# Altium PCB SOM_PCB_BLUETECHNIX.PcbDoc (part 5 of 8)
Units mil, origin at the board's own origin, x right, y up, seen from the top; angles counter-clockwise.
Board outline 1225 x 1620 mil, 8 copper layers (Top Layer, Int1 (Sign), Int2 (GND), Int3 (Sign), Int4 (Sign), Int5 (PWR), Int6 (Sign), Bottom Layer), stack 66.2 mil thick; 65 components, 201 nets, 938 pads, 497 vias.
Unrouted connection lines stored in the file: 25.
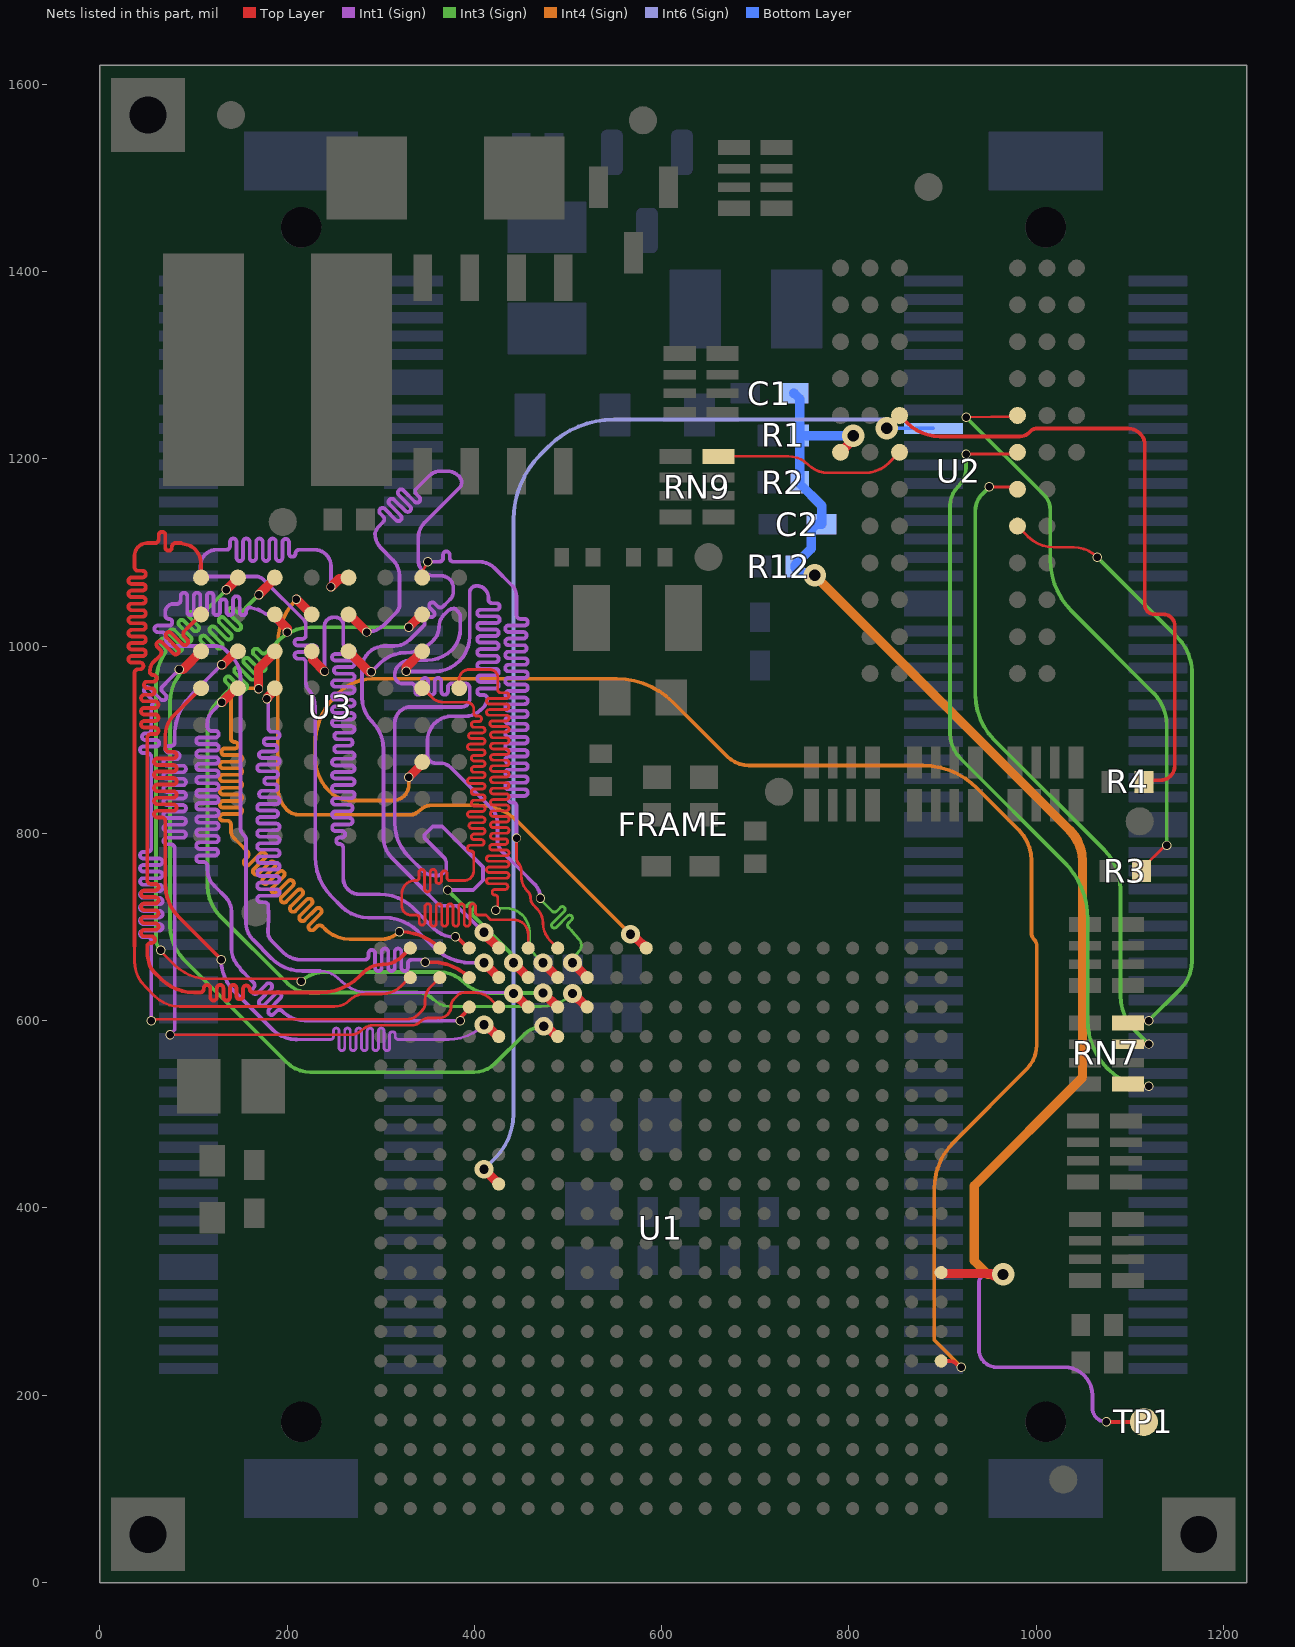
[diagram p10: the nets of this part, all layers, seen from the top]

## Via types
v1: diameter 20, hole 10, Top Layer to Int2 (GND), tented both sides, 68 vias
v2: diameter 10, hole 8, Top Layer to Int3 (Sign), tented both sides, 53 vias
v3: diameter 20, hole 10, Top Layer to Bottom Layer, tented both sides, 44 vias
v4: diameter 10, hole 8, Top Layer to Int1 (Sign), tented both sides, 41 vias
v5: diameter 20, hole 10, Top Layer to Int5 (PWR), tented both sides, 40 vias
v6: diameter 10, hole 8, Top Layer to Int4 (Sign), tented both sides, 33 vias
v7: diameter 20, hole 10, Top Layer to Int3 (Sign), tented both sides, 25 vias
v8: diameter 24, hole 12, Int6 (Sign) to Bottom Layer, tented both sides, 22 vias
v9: diameter 20, hole 10, Top Layer to Int4 (Sign), tented both sides, 19 vias
v10: diameter 24, hole 12, Int4 (Sign) to Bottom Layer, tented both sides, 17 vias
v11: diameter 24, hole 12, Int2 (GND) to Bottom Layer, tented both sides, 15 vias
v12: diameter 20, hole 10, Top Layer to Int1 (Sign), tented both sides, 13 vias
v13: diameter 24, hole 12, Top Layer to Int6 (Sign), tented both sides, 11 vias
v14: diameter 24, hole 12, Top Layer to Int4 (Sign), tented both sides, 10 vias
v15: diameter 24, hole 12, Top Layer to Int3 (Sign), tented both sides, 8 vias
v16: diameter 11, hole 8, Top Layer to Int1 (Sign), tented both sides, 8 vias
v17: diameter 10, hole 8, Top Layer to Bottom Layer, tented both sides, 7 vias
v18: diameter 20, hole 10, Top Layer to Int6 (Sign), tented both sides, 7 vias
v19: diameter 10, hole 8, Top Layer to Int6 (Sign), tented both sides, 6 vias
v20: diameter 10, hole 8, Int4 (Sign) to Bottom Layer, tented both sides, 6 vias
v21: diameter 24, hole 12, Int1 (Sign) to Bottom Layer, tented both sides, 5 vias
v22: diameter 24, hole 12, Top Layer to Int2 (GND), tented both sides, 5 vias
v23: diameter 10, hole 7, Top Layer to Int1 (Sign), tented both sides, 4 vias
v24: diameter 10, hole 8, Top Layer to Int2 (GND), tented both sides, 4 vias
v25: diameter 10, hole 8, Int2 (GND) to Bottom Layer, tented both sides, 4 vias
v26: diameter 24, hole 12, Int3 (Sign) to Bottom Layer, tented both sides, 4 vias
v27: diameter 24, hole 12, Top Layer to Bottom Layer, tented both sides, 4 vias
v28: diameter 10, hole 8, Int5 (PWR) to Bottom Layer, tented both sides, 3 vias
v29: diameter 20, hole 10, Int2 (GND) to Bottom Layer, tented both sides, 2 vias
v30: diameter 10, hole 8, Int6 (Sign) to Bottom Layer, tented both sides, 2 vias
v31: diameter 10, hole 8, Top Layer to Bottom Layer, 1 vias
v32: diameter 22, hole 12, Int2 (GND) to Bottom Layer, tented both sides, 1 vias
v33: diameter 24, hole 10, Int2 (GND) to Bottom Layer, tented both sides, 1 vias
v34: diameter 20, hole 12, Top Layer to Int5 (PWR), tented both sides, 1 vias
v35: diameter 20, hole 12, Top Layer to Int2 (GND), tented both sides, 1 vias
v36: diameter 24, hole 12, Top Layer to Int5 (PWR), tented both sides, 1 vias
v37: diameter 24, hole 12, Top Layer to Int1 (Sign), tented both sides, 1 vias

## Nets (pads, with @x,y where several pads share a name; then routed paths per layer and width w, separated by ;. In a path a pad name is that pad's centre, name@x,y a point inside that pad or via, vN(x,y) a via of type N, cw(c..) or ccw(c..) an arc to the next point about the centre after c; other vN are vias at no path point) (continued)
DDR_RES_D\R\A\S\: RN7.8 U2.H7 | length 670.8
  Top Layer w3: U2.H7@980,1128.15 991.32,1116.82 ccw(c1018.67,1144.17) 1018.67,1105.5 1040,1105.5 cw(c1040,1070.49) 1064.75,1095.25 v2(1065,1095) ; RN7.8@1097.83,597.48 1100.35,600 v2(1120,600)
  Int3 (Sign) w4: v2(1065,1095) 1150.97,1009.03 cw(c1113.98,972.03) 1165.95,978.07 cw(c1113.98,972.03) 1166.3,972.03 1166.3,667.71 1166.3,663.83 cw(c1123.96,663.83) 1153.91,633.91 v2(1120,600)
DDR_RES_D\W\R\: RN7.7 U2.G7 | length 722.3
  Top Layer w3: v2(950,1170) 977.52,1170 U2.G7@980,1167.52 ; RN7.7@1097.83,574.84 1097.99,575 v2(1120,575)
  Int3 (Sign) w4: v2(950,1170) 942.5,1162.5 ccw(c960.61,1144.39) 935.62,1150 ccw(c960.61,1144.39) 935,1144.39 935,948.28 ccw(c1003.28,948.28) 954.98,900.02 1072.32,782.68 ; 1072.34,782.66 cw(c1029.64,740) 1090,740 1090,626.21 ccw(c1141.21,626.21) 1104.99,590.01 v2(1120,575)
DDR_RES_DQM0: RN7.5 U2.F7 | length 849.9
  Top Layer w3: v2(925,1205) 978.11,1205 U2.F7@980,1206.89 ; RN7.5@1097.83,532.52 1100.35,530 v2(1120,530)
  Int3 (Sign) w4: 916.49,1170.25 ccw(c937.02,1149.74) 908,1149.74 908,907.22 ccw(c947.04,907.22) 919.41,879.64 ; 916.51,1170.28 ccw(c895.98,1190.78) 925,1190.78 v2(925,1205) ; 919.43,879.62 1030.07,768.98 ; 1030.1,768.95 cw(c969.87,708.79) 1040,757.05 cw(c969.87,708.79) 1055,708.79 1055,600 ccw(c1127.43,600) 1057.82,580 ccw(c1127.43,600) 1076.21,548.79 1077.32,547.68 ccw(c1120,590.36) v2(1120,530)
DDR_RES_DQM1: RN9.8 U2.F3 | length 205.5
  Top Layer w3: RN9.8@660.67,1202.64 735.11,1202.64 cw(c735.11,1172.53) 756.39,1193.83 ; 756.41,1193.81 ccw(c777.69,1215.11) 777.69,1185 816.65,1185 ccw(c816.65,1222.37) 843.05,1195.92 ; 843.07,1195.94 U2.F3@854.02,1206.89
DDR_RES_DQS0: R3.2 U2.E7 | length 634.2
  Top Layer w3: v2(925.1,1244.31) U2.E7@977.46,1245 ; U2.E7@977.51,1245 ccw(c977.5,1248) 979.62,1245.88 U2.E7@980,1246.26 ; R3.2@1112.52,760 1112.52,761.77 1137.81,787.07 v2(1139.5,787.07)
  Int3 (Sign) w4: v2(925.1,1244.31) 1007.88,1162.12 ; 1007.93,1162.07 cw(c990.86,1145) 1015,1145 1015,1092.68 ccw(c1093.91,1092.68) 1038.11,1036.89 1125,950 cw(c1090.01,915) 1139.5,915 v2(1139.5,787.07) ; 1007.92,1162.08 ccw(c1005.08,1159.27) 1007.88,1162.12
DDR_RES_DQS1: R4.2 U2.E3 | length 689.2
  Top Layer w4: U2.E3@854.02,1246.26 861.67,1238.6 ccw(c897.1,1274.02) 897.1,1223.93 982.51,1223.93 ccw(c982.51,1238.15) 992.57,1228.09 994.65,1230.18 cw(c999.68,1225.15) 999.68,1232.26 1098.33,1232.26 cw(c1098.33,1214.58) 1116.01,1214.58 1116.01,1043.99 ccw(c1126.01,1043.99) 1126.01,1033.99 1135.63,1033.99 cw(c1135.63,1021.67) 1147.95,1021.67 1147.95,872.18 cw(c1132.48,872.18) 1132.48,856.7 1116.7,856.7 ccw(c1116.7,855) R4.2@1115,855
DDR_VREF: C1.1 C2.2 R1.1 R2.2 R12.2 TP1.0 U1.M20 U2.F1 | length 1647.4
  Top Layer w3: U1.M20@898.46,331.02 U1.M20@899.49,330
  Top Layer w4: v4(1075,171.5) TP1.0@1114.96,171.5
  Top Layer w10: U2.F1@791.02,1206.89 801.4,1217.27 v14(804.52,1224.52) ; U1.M20@899.49,330 899.75,330.26 902.06,330.26 902.32,330 952.14,330 954.46,327.68 959.58,327.68 v14(964.55,329)
  Int1 (Sign) w4: v14(964.55,329) 947.75,329 ccw(c947.75,320) 938.75,320 938.75,248.97 ccw(c957.72,248.97) 957.72,230 1030,230 cw(c1030,200) 1060,200 1060,186.5 ccw(c1075,186.5) v4(1075,171.5)
  Int4 (Sign) w10: v10(763.35,1075.75) 1035.84,803.27 cw(c1003.08,770.52) 1049.4,770.52 1049.4,539.4 933.75,423.75 933.75,343.52 948.07,329.21 962.09,329.21 962.3,329 v14(964.55,329)
  Bottom Layer w10: C1.1@740.76,1270 741.68,1270 747.52,1264.16 R1.1@747.52,1225 ; v10(763.35,1075.75) 760.68,1078.43 747.56,1078.43 742.52,1083.47 742.52,1086.77 759.84,1104.09 759.84,1124.16 765.68,1130 C2.2@770.76,1130 770.76,1149.98 747.52,1173.23 R2.2@747.52,1175 R1.1@747.52,1225 ; v14(804.52,1224.52) 804.28,1224.76 747.76,1224.76 R1.1@747.52,1225
  other v10: 804.52,1224.52
DR0PRI: FRAME.94 U1.J5 | length 1239.1
  Top Layer w10: v18(410.28,441.26) U1.J5@426.02,425.51
  Int6 (Sign) w4: v18(410.28,441.26) 422,452.99 ; 422.03,453.01 ccw(c374.28,500.71) 441.77,500.71 441.77,1134.4 cw(c541.77,1134.4) 471.06,1205.11 478.66,1212.71 cw(c549.37,1142) 549.37,1242 v8@840.28,1242 ; v8(840.28,1232.52) v8@843.78,1236.02
  Bottom Layer w4: v8(840.28,1232.52) FRAME.94@890.12,1232.52
F\L\A\S\H\_\A\S\M\0\: U1.A10 U3.B4 | length 703.9
  Top Layer w10: v6(210,1050) U3.B4@226.26,1033.74 ; v9(566.78,692.32) 571.34,689.65 U1.A10@583.5,677.48
  Int4 (Sign) w4: v6(210,1050) ccw(c258.28,1001.72) 190,1001.72 190,849.14 ccw(c224.14,849.14) 200,825 ccw(c212.07,837.07) 212.07,820 333.53,820 ccw(c333.53,825.91) 337.71,821.73 ccw(c330.21,837.07) 342.29,825 cw(c354.36,812.93) 354.36,830 404,830 cw(c404,769.56) 446.73,812.31 v9(566.78,692.32)
F\L\A\S\H\_\W\A\I\T\: U1.R20 U3.F7 | length 1687.6
  Top Layer w4: U3.F7@344.37,874.37 U3.F7@344.37,876.26 ; U1.R20@898.46,236.54 907.54,236.54 cw(c907.54,226.15) 914.88,233.49 918.38,230 v6(920,230)
  Top Layer w10: v6(330,860) U3.F7@344.37,874.37
  Int4 (Sign) w4: v6(330,860) 330,852.07 cw(c312.93,852.07) 325,840 cw(c312.93,852.07) 312.93,835 269.14,835 cw(c269.14,869.14) 261.47,835.87 cw(c269.14,869.14) 245,845 cw(c281.21,881.21) 230,881.21 230,895 cw(c302.43,895) 251.21,946.21 255.01,950.01 cw(c291.21,913.79) 291.21,965 551.85,965 cw(c551.85,879.64) 612.2,940 670,882.2 ccw(c693.38,905.58) 693.38,872.52 878.79,872.52 cw(c878.79,791.19) 924.38,858.54 cw(c878.79,791.19) 936.3,848.7 981.38,803.62 cw(c948.62,770.86) 994.95,770.86 994.95,693.52 ccw(c1004.55,693.52) 997.76,686.73 ; v6(920,230) 891.1,258.9 891.1,419.95 cw(c962.6,419.95) 912.01,470.46 cw(c962.6,419.95) 912.04,470.5 989.63,548.08 ccw(c963.2,574.51) 1000.57,574.51 1000.57,679.95 ccw(c990.98,679.95) 997.77,686.72
FLASH_A1: U1.B2 U3.A1 | length 1129.5
  Top Layer w3: 37.09,679.5 37.09,663.7 ccw(c75.22,663.7) 48.26,636.74 59.13,625.87 ccw(c85.37,652.11) 85.37,615 250.45,615 ccw(c250.45,638.05) 266.73,621.73 cw(c283.05,605.45) 283.05,628.5 301.14,628.5 ccw(c301.14,658.35) 322.24,637.24 330.98,645.98 U1.B2@331.54,645.98
  Top Layer w4: 37.09,679.5 37.09,962.33 37.09,966.14 37.09,971.33 cw(c41.09,971.33) 41.09,975.33 43.05,975.33 ccw(c43.05,978.83) 43.05,982.33 34.09,982.33 cw(c34.09,985.83) 34.09,989.33 45.59,989.33 ccw(c45.59,992.83) 45.59,996.33 34.09,996.33 cw(c34.09,999.83) 34.09,1003.33 45.59,1003.33 ccw(c45.59,1006.83) 45.59,1010.33 34.09,1010.33 cw(c34.09,1013.83) 34.09,1017.33 45.59,1017.33 ccw(c45.59,1020.83) 45.59,1024.33 34.09,1024.33 cw(c34.09,1027.83) 34.09,1031.33 45.59,1031.33 ccw(c45.59,1034.83) 45.59,1038.33 34.09,1038.33 cw(c34.09,1041.83) 34.09,1045.33 45.59,1045.33 ccw(c45.59,1048.83) 45.59,1052.33 34.09,1052.33 cw(c34.09,1055.83) 34.09,1059.33 45.59,1059.33 ccw(c45.59,1062.83) 45.59,1066.33 34.09,1066.33 cw(c34.09,1069.83) 34.09,1073.33 45.59,1073.33 ccw(c45.59,1076.83) 45.59,1080.33 41.09,1080.33 cw(c41.09,1084.33) 37.09,1084.33 37.09,1094.8 37.09,1096.8 ; 37.09,1096.5 cw(c50.59,1096.5) 37.09,1096.8 ; U3.A1@108.15,1073.11 108.15,1087.55 ccw(c85.7,1087.55) 101.57,1103.43 ccw(c85.7,1087.55) 98.98,1105.65 ccw(c85.7,1087.55) 96.98,1106.96 86.59,1109.98 85.7,1110 80.95,1110 ccw(c80.95,1106) 76.95,1106 76.95,1105.34 cw(c73.45,1105.34) 69.95,1105.34 69.95,1118.5 ccw(c66.45,1118.5) 62.95,1118.5 62.95,1114 cw(c58.95,1114) 58.95,1110 56.95,1110 50.59,1110 ccw(c50.59,1096.5) 41.05,1106.05 ccw(c50.59,1096.5) 37.09,1096.8
FLASH_A2: U1.A2 U3.B1 | length 1124.8
  Top Layer w4: U3.B1@108.15,1033.74 94.7,1020.3 90.18,1015.77 ccw(c93,1012.94) 90.18,1010.11 93.36,1006.93 cw(c90.88,1004.45) 93.36,1001.98 cw(c90.88,1004.45) 88.41,1001.98 76.39,1014 ccw(c73.91,1011.52) 71.44,1014 ccw(c73.91,1011.52) 71.44,1009.05 83.46,997.03 cw(c80.98,994.55) 83.46,992.08 cw(c80.98,994.55) 78.51,992.08 66.49,1004.1 ccw(c64.01,1001.62) 61.54,1004.1 ccw(c64.01,1001.62) 61.54,999.15 64.72,995.97 cw(c61.89,993.14) 64.72,990.31 56.95,982.54 ccw(c64.95,974.53) 53.63,974.53 ccw(c57.33,973) 57.33,969 cw(c57.33,965.5) 57.33,962 50.59,962 ccw(c50.59,958.5) 50.59,955 55.09,955 cw(c55.09,951.5) 55.09,948 47.59,948 ccw(c47.59,944.5) 47.59,941 59.09,941 cw(c59.09,937.5) 59.09,934 47.59,934 ccw(c47.59,930.5) 47.59,927 59.09,927 cw(c59.09,923.5) 59.09,920 47.59,920 ccw(c47.59,916.5) 47.59,913 59.09,913 cw(c59.09,909.5) 59.09,906 54.59,906 ccw(c54.59,902) 50.59,902 50.59,893 50.59,760 50.59,750.03 ccw(c54.59,750.03) 54.59,746.03 59.09,746.03 cw(c59.09,742.53) 59.09,739.03 47.59,739.03 ccw(c47.59,735.53) 47.59,732.03 59.09,732.03 cw(c59.09,728.53) 59.09,725.03 47.59,725.03 ccw(c47.59,721.53) 47.59,718.03 59.09,718.03 cw(c59.09,714.53) 59.09,711.03 47.59,711.03 ccw(c47.59,707.53) 47.59,704.03 59.09,704.03 cw(c59.09,700.53) 59.09,697.03 47.59,697.03 ccw(c47.59,693.53) 47.59,690.03 55.38,690.03 cw(c55.38,686.53) 55.38,683.03 54.59,683.03 ccw(c54.59,679.03) 50.59,679.03 50.59,669.79 53.52,658.03 ccw(c75.64,669.79) 54.71,656.03 ccw(c75.64,669.79) 57.85,652.15 ccw(c75.64,669.79) 57.93,652.07 65.3,644.7 ccw(c100.8,680.2) 100.8,630 105,630 107,630 ccw(c107,634) 111,634 111,634.69 cw(c114.5,634.69) 118,634.69 118,625 ccw(c121.5,625) 125,625 125,634.69 cw(c128.5,634.69) 132,634.69 132,625 ccw(c135.5,625) 139,625 139,634.69 cw(c142.5,634.69) 146,634.69 146,626.32 ccw(c149.5,626.32) 153,626.32 153,634 cw(c156.5,634) 160,634 ccw(c164,634) 164,630 176.62,630 235,630 ccw(c235,690.36) 277.68,647.68 281.5,651.5 cw(c302.03,630.96) 302.03,660 ccw(c302.03,689.04) 322.54,668.48 U1.A2@331.54,677.48
FLASH_A3: U1.B3 U3.C1 | length 1112.7
  Top Layer w3: v4(55,600) 56.34,601.34 60.1,601.34 60.26,601.5 327.98,601.5 ccw(c327.98,618) 339.63,606.32 ; 339.64,606.33 344.47,611.16 ccw(c337.46,618.18) 347.38,618.18 347.38,622.28 cw(c366.81,622.28) 353.06,636.01 U1.B3@363.03,645.98
  Top Layer w10: v4(85,975) 88.78,975 U3.C1@108.15,994.37
  Int1 (Sign) w4: v4(55,600) 55,683.18 55,685.18 ccw(c51,685.18) 51,689.18 46.5,689.18 cw(c46.5,692.68) 46.5,696.18 63.5,696.18 ccw(c63.5,699.68) 63.5,703.18 46.5,703.18 cw(c46.5,706.68) 46.5,710.18 63.5,710.18 ccw(c63.5,713.68) 63.5,717.18 46.5,717.18 cw(c46.5,720.68) 46.5,724.18 63.5,724.18 ccw(c63.5,727.68) 63.5,731.18 46.5,731.18 cw(c46.5,734.68) 46.5,738.18 63.5,738.18 ccw(c63.5,741.68) 63.5,745.18 46.5,745.18 cw(c46.5,748.68) 46.5,752.18 63.5,752.18 ccw(c63.5,755.68) 63.5,759.18 46.5,759.18 cw(c46.5,762.68) 46.5,766.18 63.5,766.18 ccw(c63.5,769.68) 63.5,773.18 46.5,773.18 cw(c46.5,776.68) 46.5,780.18 51,780.18 ccw(c51,784.18) 55,784.18 55,797.42 55,879.72 55,881.72 ccw(c51,881.72) 51,885.72 46.5,885.72 cw(c46.5,889.22) 46.5,892.72 59.96,892.72 ccw(c59.96,896.22) 59.96,899.72 48.63,899.72 cw(c48.63,903.22) 48.63,906.72 51,906.72 ccw(c51,910.72) 55,910.72 55,920 55,930 cw(c91.21,930) 55.3,934.65 cw(c91.21,930) 55.7,937.08 56.27,938.15 ccw(c52.74,940.03) 55.57,942.86 48.21,950.23 cw(c50.68,952.7) 48.21,955.18 cw(c50.68,952.7) 53.16,955.18 65.18,943.16 ccw(c67.65,945.63) 70.13,943.16 ccw(c67.65,945.63) 70.13,948.1 66.94,951.29 cw(c69.77,954.12) 66.94,956.94 75.3,965.3 v4(85,975)
FLASH_A4: U1.D5 U3.D1 | length 1108.3
  Top Layer w4: 78.37,925.22 ccw(c98.61,905) 70,905 70,899.02 70,891.06 ccw(c74,891.06) 74,887.06 78.5,887.06 cw(c78.5,883.56) 78.5,880.06 61.5,880.06 ccw(c61.5,876.56) 61.5,873.06 78.5,873.06 cw(c78.5,869.56) 78.5,866.06 61.5,866.06 ccw(c61.5,862.56) 61.5,859.06 78.5,859.06 cw(c78.5,855.56) 78.5,852.06 61.5,852.06 ccw(c61.5,848.56) 61.5,845.06 78.5,845.06 cw(c78.5,841.56) 78.5,838.06 61.5,838.06 ccw(c61.5,834.56) 61.5,831.06 78.5,831.06 cw(c78.5,827.56) 78.5,824.06 61.5,824.06 ccw(c61.5,820.56) 61.5,817.06 66,817.06 cw(c66,813.06) 70,813.06 70,811.06 70,745 ccw(c118.28,745) 84.12,710.88 ; 78.38,925.23 U3.D1@108.15,955 ; 84.14,710.86 129.51,665.49 v4(129.51,664.97)
  Top Layer w10: v12(410.28,595.5) 412.43,595.5 424.94,582.99 U1.D5@426.02,582.99
  Int1 (Sign) w3: 210,580 245,580 246.5,580 ccw(c246.5,583) 249.5,583 249.5,589 cw(c252.5,589) 255.5,589 255.5,571 ccw(c258.5,571) 261.5,571 261.5,589 cw(c264.5,589) 267.5,589 267.5,571 ccw(c270.5,571) 273.5,571 273.5,589 cw(c276.5,589) 279.5,589 279.5,571 ccw(c282.5,571) 285.5,571 285.5,589 cw(c288.5,589) 291.5,589 291.5,571 ccw(c294.5,571) 297.5,571 297.5,589 cw(c300.5,589) 303.5,589 303.5,571 ccw(c306.5,571) 309.5,571 309.5,585.25 cw(c312.5,585.25) 315.5,585.25 315.5,583 ccw(c318.5,583) 318.5,580 330.49,580 372.86,580 ccw(c372.86,632.92) 378.77,580.33 ccw(c372.86,632.92) v12(410.28,595.5)
  Int1 (Sign) w4: v4(129.51,664.97) ccw(c176.56,664.97) 130,658.23 ccw(c176.56,664.97) 143.28,631.72 185,590 ccw(c209.14,614.14) 209.14,580 210,580
FLASH_A5: U1.C4 U3.D2 | length 1111.4
  Top Layer w4: v4@386.15,604.48 394.53,612.86 U1.C4@394.53,614.49
  Top Layer w10: v4(130,940) 130.63,940 145.63,955 U3.D2@147.52,955
  Int1 (Sign) w4: 115,921.06 115,920.88 115,917.03 ; v4(130,940) 120.63,930.63 ccw(c134.24,917.03) 115,917.03 ; 150.86,654.14 152.92,652.09 ; 155,650 155.9,649.1 164.27,640.73 cw(c161.44,637.9) 164.27,635.07 163.62,634.41 ccw(c166.09,631.94) 163.62,629.46 ccw(c166.09,631.94) 168.57,629.46 178.06,638.96 cw(c180.54,636.49) 183.01,638.96 cw(c180.54,636.49) 183.01,634.01 170.99,621.99 ccw(c173.47,619.51) 170.99,617.04 ccw(c173.47,619.51) 175.94,617.04 187.96,629.06 cw(c190.44,626.59) 192.91,629.06 cw(c190.44,626.59) 192.91,624.11 180.89,612.09 ccw(c183.37,609.62) 180.89,607.14 ccw(c183.37,609.61) 185.84,607.14 189.02,610.32 cw(c191.85,607.49) 194.68,610.32 195,610 ; 154.98,650.03 154.48,650.52 152.92,652.09 ; 195.03,609.98 ccw(c219.14,634.14) 196.12,608.93 ccw(c219.14,634.14) 219.14,600 v4(385,600) ; 115,917.03 115,913.39 ccw(c119,913.39) 119,909.39 123.5,909.39 cw(c123.5,905.89) 123.5,902.39 106.5,902.39 ccw(c106.5,898.89) 106.5,895.39 123.5,895.39 cw(c123.5,891.89) 123.5,888.39 106.5,888.39 ccw(c106.5,884.89) 106.5,881.39 123.5,881.39 cw(c123.5,877.89) 123.5,874.39 106.5,874.39 ccw(c106.5,870.89) 106.5,867.39 123.5,867.39 cw(c123.5,863.89) 123.5,860.39 106.5,860.39 ccw(c106.5,856.89) 106.5,853.39 123.5,853.39 cw(c123.5,849.89) 123.5,846.39 106.5,846.39 ccw(c106.5,842.89) 106.5,839.39 123.5,839.39 cw(c123.5,835.89) 123.5,832.39 106.5,832.39 ccw(c106.5,828.89) 106.5,825.39 123.5,825.39 cw(c123.5,821.89) 123.5,818.39 106.5,818.39 ccw(c106.5,814.89) 106.5,811.39 123.5,811.39 cw(c123.5,807.89) 123.5,804.39 106.5,804.39 ccw(c106.5,800.89) 106.5,797.39 123.5,797.39 cw(c123.5,793.89) 123.5,790.39 106.5,790.39 ccw(c106.5,786.89) 106.5,783.39 122.84,783.39 cw(c122.84,779.89) 122.84,776.39 106.5,776.39 ccw(c106.5,772.89) 106.5,769.39 111,769.39 cw(c111,765.39) 115,765.39 115,765 115,760.89 ccw(c138.08,760.89) 121.76,744.57 ccw(c139.41,759.18) 123.21,742.98 134.1,732.08 cw(c118.3,716.28) 140.65,716.28 140.65,677.27 ccw(c169.42,677.27) 149.07,656.92 ccw(c172.03,671.2) 152.92,652.09
FLASH_A6: U1.C7 U3.A2 | length 1023.7
  Top Layer w3: v2(65,675) 65,674.38 79.85,659.54 ; 79.86,659.52 ccw(c115.69,695.38) 115.69,644.69 212.3,644.69 v2(215.15,641.84)
  Top Layer w10: v2(135,1060) 147.52,1072.52 U3.A2@147.52,1073.11 ; v7(473.22,629.58) 473.57,629.58 488.66,614.49 U1.C7@489.02,614.49
  Int3 (Sign) w3: v2@215.15,638.65 v2(215.15,641.84)
  Int3 (Sign) w4: v2(65,675) cw(c77.07,687.07) 63.14,677.2 cw(c77.07,687.07) 60,687.07 60,960 cw(c120.36,960) 68.27,990.49 cw(c120.36,960) 69.34,992.25 69.61,992.59 ccw(c66.49,995.09) 69.32,997.92 65.11,1002.13 cw(c67.58,1004.6) 65.11,1007.08 cw(c67.58,1004.6) 70.06,1007.08 82.08,995.06 ccw(c84.55,997.53) 87.03,995.06 ccw(c84.55,997.53) 87.03,1000.01 75.01,1012.03 cw(c77.48,1014.5) 75.01,1016.98 cw(c77.48,1014.5) 79.96,1016.98 91.98,1004.96 ccw(c94.45,1007.43) 96.93,1004.96 ccw(c94.45,1007.43) 96.93,1009.91 84.91,1021.93 cw(c87.38,1024.4) 84.91,1026.88 cw(c87.38,1024.4) 89.86,1026.88 99.96,1016.78 ccw(c102.43,1019.25) 104.91,1016.78 ccw(c102.43,1019.25) 104.91,1021.73 95.82,1030.81 cw(c98.3,1033.29) 95.82,1035.76 cw(c98.3,1033.29) 100.77,1035.76 102.94,1033.6 ccw(c105.77,1036.42) 108.6,1033.6 119.69,1044.69 v2(135,1060) ; v2(215.15,641.84) cw(c239.46,617.53) 239.46,651.91 362.03,651.91 cw(c362.03,613.68) 389.06,640.71 ccw(c415.95,667.61) 415.95,629.58 v7(473.22,629.58)
FLASH_A7: U1.C5 U3.C2 | length 1108.6
  Top Layer w3: v4(75,585) 267.93,585 ccw(c267.93,602.07) 280,590 cw(c292.07,577.93) 292.07,595 332.84,595 ccw(c332.84,608.64) 342.47,598.99 ; 342.48,598.99 cw(c352.12,589.35) 352.12,602.99 359.96,602.99 ccw(c359.96,621.91) 361.42,603.04 cw(c361.65,600.05) 361.94,603.04 ccw(c363.03,614.49) 363.03,602.99 ccw(c363.03,614.49) 371.14,606.34 ccw(c363.03,614.49) 371.18,606.38 ccw(c363.03,614.49) 371.9,607.17 ccw(c364.41,614.65) 372.21,607.49 ccw(c364.41,614.65) 375,614.65 cw(c387.91,614.65) 378.78,623.78 381.89,626.89 cw(c389.4,619.38) 389.4,630 400,630 cw(c400,604.62) 417.94,622.58 ; 417.94,622.57 U1.C5@426.02,614.49
  Top Layer w10: v4(130,980) 131.26,980 145.63,994.37 U3.C2@147.52,994.37 ; U1.C5@426.02,614.49 U1.C5@426.02,614.62
  Int1 (Sign) w3: v4(75,585) 75,585.26 80,590.26
  Int1 (Sign) w4: 80,590.26 80,782.28 80,784.28 ccw(c76,784.28) 76,788.28 71.5,788.28 cw(c71.5,791.78) 71.5,795.28 88.5,795.28 ccw(c88.5,798.78) 88.5,802.28 71.5,802.28 cw(c71.5,805.78) 71.5,809.28 88.5,809.28 ccw(c88.5,812.78) 88.5,816.28 71.5,816.28 cw(c71.5,819.78) 71.5,823.28 88.5,823.28 ccw(c88.5,826.78) 88.5,830.28 71.5,830.28 cw(c71.5,833.78) 71.5,837.28 88.5,837.28 ccw(c88.5,840.78) 88.5,844.28 71.5,844.28 cw(c71.5,847.78) 71.5,851.28 88.5,851.28 ccw(c88.5,854.78) 88.5,858.28 71.5,858.28 cw(c71.5,861.78) 71.5,865.28 88.5,865.28 ccw(c88.5,868.78) 88.5,872.28 71.5,872.28 cw(c71.5,875.78) 71.5,879.28 81.71,879.28 ccw(c81.71,882.78) 81.71,886.28 73.64,886.28 cw(c73.64,889.78) 73.64,893.28 76,893.28 ccw(c76,897.28) 80,897.28 80,903.77 80,905 cw(c140.36,905) 80.46,912.47 cw(c140.36,905) 97.68,947.68 v4(130,980)
FLASH_A8: U1.D7 U3.A3 | length 1069.3
  Top Layer w10: v2(170,1055) 186.89,1071.89 U3.A3@186.89,1073.11 ; v7(474.22,594) 476.13,592.09 478.84,592.09 487.93,582.99 U1.D7@489.02,582.99
  Int3 (Sign) w4: 89.12,974.12 ccw(c123.28,940) 75,940 75,701.21 ccw(c126.21,701.21) 89.97,665.03 ; 89.14,974.14 109.96,994.96 111.38,996.38 ccw(c108.55,999.21) 111.38,1002.04 108.2,1005.22 cw(c110.67,1007.69) 108.2,1010.17 cw(c110.67,1007.69) 113.15,1010.17 125.17,998.15 ccw(c127.64,1000.62) 130.12,998.15 ccw(c127.64,1000.62) 130.12,1003.1 118.1,1015.12 cw(c120.57,1017.59) 118.1,1020.07 cw(c120.57,1017.59) 123.05,1020.07 135.07,1008.05 ccw(c137.54,1010.52) 140.02,1008.05 ccw(c137.54,1010.52) 140.02,1013 128,1025.02 cw(c130.47,1027.49) 128,1029.97 cw(c130.47,1027.49) 132.95,1029.97 144.97,1017.95 ccw(c147.44,1020.42) 149.92,1017.95 ccw(c147.44,1020.42) 149.92,1022.9 137.9,1034.92 cw(c140.37,1037.39) 137.9,1039.87 cw(c140.37,1037.39) 142.85,1039.87 146.03,1036.68 ccw(c148.86,1039.51) 151.68,1036.68 158.85,1043.85 v2(170,1055) ; 90,665 199.39,555.61 ccw(c225,581.21) 225,545 400,545 ccw(c400,576.11) 421.99,554.1 453.17,585.28 ; 453.18,585.29 cw(c474.22,564.23) 461.07,590.94 cw(c474.22,564.23) v7(474.22,594)
FLASH_A9: U1.C6 U3.B3 | length 1113
  Top Layer w10: U3.B3@186.89,1033.74 186.89,1031.85 200,1018.74 v4(200,1015) ; v12(441.77,629) 442.39,629 456.9,614.49 U1.C6@457.52,614.49
  Int1 (Sign) w3: 235.11,653 cw(c235.11,625.08) 254.86,644.82 cw(c231.55,615.69) 257.91,642.09 ; 257.93,642.07 ccw(c287.07,671.22) 287.07,630 440.77,630 v12(441.77,629)
  Int1 (Sign) w4: 163.47,686.53 cw(c181.33,704.34) 156.11,704.34 156.11,793.68 ccw(c151.05,793.68) 154.63,797.26 153.14,798.75 cw(c160.3,805.91) 150.18,805.91 150.18,966.32 ccw(c117.57,966.32) 140.63,989.37 133.7,996.3 ccw(c124.77,987.36) 124.77,1000 78.54,1000 cw(c78.54,1008.54) 72.51,1002.49 cw(c78.54,1008.54) 70,1008.54 70,1008.89 70,1010.89 ccw(c66,1010.89) 66,1014.89 61.93,1014.89 cw(c61.93,1018.39) 61.93,1021.89 74,1021.89 ccw(c74,1025.39) 74,1028.89 cw(c74,1032.89) 70,1032.89 70,1036.46 70.24,1038.49 cw(c78.54,1036.46) 71.01,1040.49 cw(c78.54,1036.46) 72.49,1042.49 cw(c78.54,1036.46) 78.54,1045 80.35,1045 82.35,1045 ccw(c82.35,1049) 86.35,1049 86.35,1053.5 cw(c89.85,1053.5) 93.35,1053.5 93.35,1036.5 ccw(c96.85,1036.5) 100.35,1036.5 100.35,1053.5 cw(c103.85,1053.5) 107.35,1053.5 107.35,1036.5 ccw(c110.85,1036.5) 114.35,1036.5 114.35,1053.5 cw(c117.85,1053.5) 121.35,1053.5 121.35,1036.5 ccw(c124.85,1036.5) 128.35,1036.5 128.35,1046.5 cw(c131.85,1046.5) 135.35,1046.5 135.35,1036.5 ccw(c138.85,1036.5) 142.35,1036.5 142.35,1049.71 cw(c145.85,1049.71) 149.35,1049.71 149.35,1036.5 ccw(c152.85,1036.5) 156.35,1036.5 156.35,1037.2 cw(c160.35,1037.2) 161.43,1041.05 168.95,1038.96 cw(c140,972.57) 170.95,1038.05 cw(c140,972.57) 191.21,1023.79 v4(200,1015) ; 163.5,686.5 183.5,666.5 ccw(c216.09,699.09) 187.92,662.61 ccw(c216.09,699.09) 216.09,653 235.11,653
FLASH_A10: U1.A3 U3.C3 | length 1057.2
  Top Layer w4: v6(320,695) 320.74,695 cw(c320.74,635.18) U1.A3@359.62,680.64 ; U1.A3@359.62,680.64 cw(c320.74,635.18) U1.A3@363.03,677.48 362.78,677.48 U1.A3@359.62,680.64
  Top Layer w10: v6(169.52,954.43) 169.52,975.74 186.89,993.11 U3.C3@186.89,994.37
  Int4 (Sign) w4: v6(169.52,954.43) 169.52,955 146.57,955 ccw(c146.57,948.43) 140,948.43 140,914.84 140,901.57 ccw(c144,901.57) 144,897.57 cw(c144,894.07) 144,890.57 133.31,890.57 ccw(c133.31,887.07) 133.31,883.57 148.5,883.57 cw(c148.5,880.07) 148.5,876.57 131.5,876.57 ccw(c131.5,873.07) 131.5,869.57 148.5,869.57 cw(c148.5,866.07) 148.5,862.57 131.5,862.57 ccw(c131.5,859.07) 131.5,855.57 148.5,855.57 cw(c148.5,852.07) 148.5,848.57 131.5,848.57 ccw(c131.5,845.07) 131.5,841.57 148.5,841.57 cw(c148.5,838.07) 148.5,834.57 131.5,834.57 ccw(c131.5,831.07) 131.5,827.57 148.5,827.57 cw(c148.5,824.07) 148.5,820.57 131.5,820.57 ccw(c131.5,817.07) 131.5,813.57 136,813.57 cw(c136,809.57) 140,809.57 140,807.57 140,802.96 ccw(c151.15,802.96) 143.26,795.08 148.4,789.94 157.79,780.55 cw(c154.97,777.72) 157.79,774.89 154.61,771.71 ccw(c157.09,769.23) 154.61,766.76 ccw(c157.09,769.23) 159.56,766.76 171.58,778.78 cw(c174.06,776.3) 176.53,778.78 cw(c174.06,776.3) 176.53,773.83 164.51,761.81 ccw(c166.99,759.33) 164.51,756.86 ccw(c166.99,759.33) 169.46,756.86 181.48,768.88 cw(c183.96,766.4) 186.43,768.88 cw(c183.96,766.4) 186.43,763.93 174.41,751.91 ccw(c176.89,749.43) 174.41,746.96 ccw(c176.89,749.43) 179.36,746.96 191.38,758.98 cw(c193.86,756.5) 196.33,758.98 cw(c193.86,756.5) 196.33,754.03 184.31,742.01 ccw(c186.79,739.53) 184.31,737.06 ccw(c186.79,739.53) 189.26,737.06 201.28,749.08 cw(c203.76,746.61) 206.23,749.08 cw(c203.76,746.61) 206.23,744.13 194.21,732.11 ccw(c196.69,729.63) 194.21,727.16 ccw(c196.69,729.63) 199.16,727.16 211.18,739.18 cw(c213.66,736.71) 216.13,739.18 cw(c213.66,736.71) 216.13,734.23 204.11,722.21 ccw(c206.58,719.74) 204.11,717.26 ccw(c206.58,719.73) 209.06,717.26 221.08,729.28 cw(c223.56,726.81) 226.03,729.28 cw(c223.56,726.81) 226.03,724.33 214.01,712.31 ccw(c216.48,709.84) 214.01,707.36 ccw(c216.48,709.84) 218.96,707.36 230.98,719.38 cw(c233.45,716.91) 235.93,719.38 cw(c233.45,716.91) 235.93,714.43 223.91,702.41 ccw(c226.38,699.94) 223.91,697.46 ccw(c226.38,699.94) 228.86,697.46 232.04,700.64 cw(c234.87,697.81) 237.7,700.64 239.11,699.23 240.58,697.76 ccw(c266.95,724.13) 243.67,695 ccw(c266.95,724.13) 266.95,686.84 300.29,686.84 ccw(c300.29,714.71) v6(320,695)
FLASH_A11: U1.B4 U3.D3 | length 1107.5
  Top Layer w4: v4(347.5,662.5) 354.65,662.5 cw(c354.65,606.11) U1.B4@394.53,645.98
  Top Layer w10: v4(178.51,943.71) 179.38,944.58 179.38,945.59 186.89,953.11 U3.D3@186.89,955
  Int1 (Sign) w4: v4(178.51,943.71) cw(c174.9,940.11) 180,940.11 180,928.44 180,926.44 180,912.44 ccw(c184,912.44) 184,908.44 188.5,908.44 cw(c188.5,904.94) 188.5,901.44 178.5,901.44 ccw(c178.5,897.94) 178.5,894.44 186.05,894.44 cw(c186.05,890.94) 186.05,887.44 173.5,887.44 ccw(c173.5,883.94) 173.5,880.44 188.5,880.44 cw(c188.5,876.94) 188.5,873.44 171.5,873.44 ccw(c171.5,869.94) 171.5,866.44 186.79,866.44 cw(c186.79,862.94) 186.79,859.44 179,859.44 ccw(c179,855.94) 179,852.44 186.5,852.44 cw(c186.5,848.94) 186.5,845.44 173.58,845.44 ccw(c173.58,841.94) 173.58,838.44 188.5,838.44 cw(c188.5,834.94) 188.5,831.44 171.5,831.44 ccw(c171.5,827.94) 171.5,824.44 186.88,824.44 cw(c186.88,820.94) 186.88,817.44 171.5,817.44 ccw(c171.5,813.94) 171.5,810.44 188.5,810.44 cw(c188.5,806.94) 188.5,803.44 171.5,803.44 ccw(c171.5,799.94) 171.5,796.44 188.5,796.44 cw(c188.5,792.94) 188.5,789.44 171.5,789.44 ccw(c171.5,785.94) 171.5,782.44 188.5,782.44 cw(c188.5,778.94) 188.5,775.44 171.5,775.44 ccw(c171.5,771.94) 171.5,768.44 188.5,768.44 cw(c188.5,764.94) 188.5,761.44 171.5,761.44 ccw(c171.5,757.94) 171.5,754.44 188.5,754.44 cw(c188.5,750.94) 188.5,747.44 171.5,747.44 ccw(c171.5,743.94) 171.5,740.44 188.5,740.44 cw(c188.5,736.94) 188.5,733.44 171.5,733.44 ccw(c171.5,729.94) 171.5,726.44 176,726.44 cw(c176,722.44) 180,722.44 180,720 180.1,716.92 ccw(c228.28,720) 180.27,714.92 cw(c176.29,714.53) 180.28,714.37 179.63,694.18 ccw(c191.71,694.18) 183.15,685.65 195.78,673.02 ccw(c215.15,692.39) 215.15,665 274.04,665 283,665 ccw(c283,669) 287,669 287,671.93 cw(c290.5,671.93) 294,671.93 294,656.5 ccw(c297.5,656.5) 301,656.5 301,673.5 cw(c304.5,673.5) 308,673.5 308,656.5 ccw(c311.5,656.5) 315,656.5 315,673.5 cw(c318.5,673.5) 322,673.5 322,656.5 ccw(c325.5,656.5) 329,656.5 329,661 cw(c333,661) 333,665 335,665 345,665 v4(347.5,662.5)
FLASH_A12: U1.A4 U3.C4 | length 1113
  Top Layer w4: v4(379.78,689.78) 381,689.78 393.31,677.48 U1.A4@394.53,677.48
  Top Layer w10: U3.C4@226.26,994.37 227.6,993.03 227.6,985.31 v4(239.99,972.92)
  Int1 (Sign) w4: v4(239.99,972.92) 239.99,1021.22 cw(c249.45,1021.22) 240.6,1024.57 cw(c249.45,1021.22) 246.1,1030.07 cw(c249.45,1021.22) 249.45,1030.68 252.18,1030.68 cw(c252.18,1022.87) 260,1022.87 260,1004.57 260,1002.57 ccw(c264,1002.57) 264,998.57 268.5,998.57 cw(c268.5,995.07) 268.5,991.57 251.5,991.57 ccw(c251.5,988.07) 251.5,984.57 268.5,984.57 cw(c268.5,981.07) 268.5,977.57 253.49,977.57 ccw(c253.49,974.07) 253.49,970.57 268.5,970.57 cw(c268.5,967.07) 268.5,963.57 251.5,963.57 ccw(c251.5,960.07) 251.5,956.57 268.5,956.57 cw(c268.5,953.07) 268.5,949.57 251.5,949.57 ccw(c251.5,946.07) 251.5,942.57 268.5,942.57 cw(c268.5,939.07) 268.5,935.57 251.5,935.57 ccw(c251.5,932.07) 251.5,928.57 268.5,928.57 cw(c268.5,925.07) 268.5,921.57 251.5,921.57 ccw(c251.5,918.07) 251.5,914.57 268.5,914.57 cw(c268.5,911.07) 268.5,907.57 253.95,907.57 ccw(c253.95,904.07) 253.95,900.57 266.5,900.57 cw(c266.5,897.07) 266.5,893.57 253.73,893.57 ccw(c253.73,890.07) 253.73,886.57 268.5,886.57 cw(c268.5,883.07) 268.5,879.57 251.5,879.57 ccw(c251.5,876.07) 251.5,872.57 268.5,872.57 cw(c268.5,869.07) 268.5,865.57 251.5,865.57 ccw(c251.5,862.07) 251.5,858.57 268.5,858.57 cw(c268.5,855.07) 268.5,851.57 251.5,851.57 ccw(c251.5,848.07) 251.5,844.57 268.5,844.57 cw(c268.5,841.07) 268.5,837.57 251.5,837.57 ccw(c251.5,834.07) 251.5,830.57 266.5,830.57 cw(c266.5,827.07) 266.5,823.57 251.5,823.57 ccw(c251.5,820.07) 251.5,816.57 266.5,816.57 cw(c266.5,813.07) 266.5,809.57 251.6,809.57 ccw(c251.6,806.07) 251.6,802.57 258.51,802.57 cw(c258.51,799.07) 258.51,795.57 256,795.57 ccw(c256,792.07) 256,788.57 cw(c256,784.57) 260,784.57 260,777.97 260,752.07 ccw(c277.07,752.07) 265,740 ccw(c277.07,752.07) 277.07,735 298.79,735 cw(c298.79,683.79) 335,720 356.43,698.57 ccw(c379.16,721.3) 379.16,689.16 v4(379.78,689.78)
FLASH_A13: U1.B5 U3.A5 | length 1113.8
  Top Layer w10: v4(246.87,1063.13) 255.51,1071.77 264.29,1071.77 U3.A5@265.63,1073.11 ; v12(410.28,661.73) U1.B5@426.02,645.98
  Int1 (Sign) w4: v4(246.87,1063.13) 247.93,1064.19 246.87,1065.24 246.87,1085.45 ccw(c229.51,1085.45) 229.51,1102.82 229.32,1102.82 213,1102.82 ccw(c213,1098.82) 209,1098.82 cw(c205.5,1098.81) 202,1098.81 202,1110.88 ccw(c198.5,1110.88) 195,1110.88 195,1094.32 cw(c191.5,1094.32) 188,1094.32 188,1111.32 ccw(c184.5,1111.32) 181,1111.32 181,1094.32 cw(c177.5,1094.32) 174,1094.32 174,1111.32 ccw(c170.5,1111.32) 167,1111.32 167,1094.32 cw(c163.5,1094.32) 160,1094.32 160,1111.32 ccw(c156.5,1111.32) 153,1111.32 153,1094.32 cw(c149.5,1094.32) 146,1094.32 146,1111.32 ccw(c142.5,1111.32) 139,1111.32 139,1106.82 cw(c135,1106.82) 135,1102.82 133,1102.82 124.6,1102.82 ccw(c124.6,1085.74) 112.52,1097.81 ccw(c124.6,1085.74) 107.52,1085.74 107.52,1082.67 ccw(c115.84,1082.67) 115.84,1074.36 166.66,1074.36 cw(c166.66,1062.68) 174.92,1070.94 217.84,1028.02 cw(c212.62,1022.8) 220,1022.8 220,1019.74 220,1011.57 cw(c216,1011.57) 216,1007.57 211.5,1007.57 ccw(c211.5,1004.07) 211.5,1000.57 228.5,1000.57 cw(c228.5,997.07) 228.5,993.57 211.5,993.57 ccw(c211.5,990.07) 211.5,986.57 216,986.57 cw(c216,982.57) 220,982.57 220,969.93 ; v12(410.28,661.73) 396.79,661.73 cw(c396.79,718.52) 356.63,678.37 340,695 ccw(c303.79,658.79) 303.79,710 286.89,710 cw(c286.89,750.78) 258.05,721.95 247.68,732.32 cw(c290.36,775) 230,775 230,934.56 ccw(c201.09,934.56) 226.31,948.69 ccw(c201.09,934.56) 221.53,955 cw(c237.07,962.07) 220,962.07 220,965.43 ; 220,965.43 220,966.57 220,969.93 ; 220,965.43 220,969.93
FLASH_A14: U1.A5 U3.B5 | length 1108.6
  Top Layer w10: U3.B5@265.63,1033.74 266.26,1033.74 v4(285,1015) ; v12(410.23,694.26) 411.42,692.27 412.02,691.49 U1.A5@426.02,677.48
  Int1 (Sign) w4: v4(285,1015) ccw(c285,1041.1) 288.13,1015.19 ccw(c285,1041.1) 303.46,1022.65 316.55,1035.74 ccw(c308.23,1044.06) 320,1044.06 ; 287.02,992.96 ccw(c303.99,976.01) 280,976.01 280,945 ccw(c316.21,945) 290.61,919.39 ; 287.03,992.97 cw(c303.99,976.01) 303.99,1000 314.07,1000 ccw(c314.07,1024.33) 331.27,1007.12 344.57,1020.43 345.99,1021.84 ccw(c343.16,1024.67) 345.99,1027.5 342.8,1030.68 cw(c345.28,1033.16) 342.8,1035.63 cw(c345.28,1033.16) 347.75,1035.63 351.48,1031.91 ccw(c353.95,1034.38) 356.43,1031.91 ccw(c353.95,1034.38) 356.43,1036.86 352.7,1040.58 cw(c355.18,1043.06) 352.7,1045.53 cw(c355.18,1043.06) 357.65,1045.53 360.83,1042.35 ccw(c363.66,1045.18) 366.49,1042.35 372,1047.85 374.38,1050.23 ccw(c366.83,1057.78) 377.5,1057.78 377.5,1062.2 ccw(c364.7,1062.2) 373.75,1071.25 ccw(c364.7,1062.2) 364.7,1075 357.07,1075 cw(c357.07,1092.07) 345,1080 cw(c357.07,1092.07) 340,1092.07 340,1115.21 cw(c363.62,1115.21) 346.91,1131.91 384.38,1169.38 ccw(c379.45,1174.31) 386.43,1174.31 ccw(c376.14,1174.31) 383.42,1181.58 ccw(c370.8,1168.97) 370.8,1186.81 363.8,1186.81 ccw(c363.8,1169.92) 356.07,1184.93 ccw(c363.8,1169.92) 354.3,1183.88 351.88,1181.88 ; 290.63,919.37 cw(c260.69,889.47) 303,889.47 303,795 ccw(c332.31,795) 311.59,774.27 340.43,745.43 363.09,722.77 380.91,722.77 v12(410.23,694.26) ; 320,1042.06 320,1044.06 ; 351.86,1181.86 338,1168 ccw(c340.82,1165.17) 338,1162.34 341.18,1159.16 cw(c338.7,1156.68) 341.18,1154.21 cw(c338.7,1156.68) 336.23,1154.21 324.21,1166.23 ccw(c321.73,1163.75) 319.26,1166.23 ccw(c321.73,1163.75) 319.26,1161.28 331.28,1149.26 cw(c328.8,1146.78) 331.28,1144.31 cw(c328.8,1146.78) 326.33,1144.31 314.31,1156.33 ccw(c311.83,1153.85) 309.36,1156.33 ccw(c311.83,1153.85) 309.36,1151.38 321.38,1139.36 cw(c318.9,1136.88) 321.38,1134.41 cw(c318.9,1136.88) 316.43,1134.41 304.41,1146.43 ccw(c301.93,1143.95) 299.46,1146.43 ccw(c301.93,1143.95) 299.46,1141.48 302.64,1138.3 cw(c299.81,1135.47) 302.64,1132.64 301.23,1131.23 299.57,1129.57 ccw(c316.64,1112.5) 293.83,1120.41 ccw(c316.13,1120.41) 300.35,1104.65 312.93,1092.07 cw(c295.86,1075) 320,1075 320,1044.06
FLASH_A15: U1.B6 U3.C5 | length 1071.3
  Top Layer w10: U3.C5@265.63,994.37 287.5,972.5 v4(290,972.5) ; v7(441.77,661.73) U1.B6@457.52,645.98
  Int1 (Sign) w4: v4(290,972.5) 299.01,981.51 ; 299.03,981.53 cw(c326.75,953.77) 326.75,993 ccw(c326.75,1032.23) 354.47,1004.47 ; 318.52,978.52 ccw(c327.07,970) 315,970 315,968.54 ccw(c323.54,968.54) 317.49,962.51 ccw(c323.54,968.54) 323.54,960 323.74,960 332.74,960 cw(c332.74,956) 336.74,956 336.74,951.5 ccw(c340.24,951.5) 343.74,951.5 343.74,962.43 cw(c347.24,962.43) 350.74,962.43 350.74,951.5 ccw(c354.24,951.5) 357.74,951.5 357.74,962.43 cw(c361.24,962.43) 364.74,962.43 364.74,951.5 ccw(c368.24,951.5) 371.74,951.5 371.74,956 cw(c375.74,956) 375.74,960 384.74,960 385.81,960 387.81,959.99 390.64,959.98 cw(c390.65,955.98) 394.28,957.66 cw(c387,954.34) 395,954.34 395,943.54 cw(c386.46,943.54) 392.51,937.51 cw(c386.46,943.54) 386.46,935 332.07,935 ccw(c332.07,917.93) 325.03,933.48 ccw(c326.67,929.83) 324.38,933.11 320.53,930.43 ; 318.54,978.54 320,980 cw(c332.07,967.93) 332.07,985 349.64,985 ccw(c349.64,1022.09) 375.86,995.86 ccw(c353.81,1017.92) 385,1017.92 385,1030.84 ccw(c376.54,1030.84) 382.54,1036.81 ; 320.52,930.43 ccw(c322.8,927.15) 319.98,929.98 ccw(c331.99,917.96) 315,917.96 315,811.21 ccw(c366.21,811.21) 329.99,775.01 345,760 ccw(c357.07,772.07) 357.07,755 360,755 ccw(c360,765) 367.06,757.92 ; 354.49,1004.49 356.53,1006.53 ccw(c342.91,1020.15) 362.17,1020.15 cw(c381.44,1020.15) 367.81,1033.77 371,1036.95 cw(c378.35,1029.6) 378.35,1040 cw(c378.35,1037.6) 380.05,1039.3 382.52,1036.82 ; 367.07,757.93 370,760.86 370,767.82 ccw(c360.16,767.82) 367.13,774.76 346.7,795.19 346.7,798.51 355.57,807.38 365.73,807.38 409.11,764 409.11,750 398.69,739.58 372.13,739.58 v2(371.35,739.5)
  Int3 (Sign) w4: v2(371.35,739.5) 386.1,724.76 387.51,723.35 ccw(c390.34,726.18) 393.17,723.35 394.17,724.35 cw(c396.65,721.88) 399.12,724.35 cw(c396.65,721.88) 399.12,719.4 398.13,718.41 ccw(c400.96,715.58) 398.13,712.75 412.07,698.82 413.49,697.41 437.55,673.37 cw(c434.71,670.56) 438.71,670.56 438.71,664.79 v7(441.77,661.73)
FLASH_A16: U1.A6 U3.D7 | length 1119.5
  Top Layer w3: U3.D7@344.37,955 cw(c344.37,953.48) 345.45,954.55 355,945 ccw(c367.07,957.07) 367.07,940 391.94,940 cw(c391.94,932.61) 397.16,937.84 cw(c391.94,932.61) 399.33,932.61 399.33,929.81 399.33,928.31 ccw(c402.33,928.31) 402.33,925.31 404.59,925.31 cw(c404.59,922.31) 404.59,919.31 399.74,919.31 ccw(c399.74,916.31) 399.74,913.31 408.33,913.31 cw(c408.33,910.31) 408.33,907.31 396.81,907.31 ccw(c396.81,904.31) 396.81,901.31 408.33,901.31 cw(c408.33,898.31) 408.33,895.31 395.71,895.31 ccw(c395.71,892.31) 395.71,889.31 408.33,889.31 cw(c408.33,886.31) 408.33,883.31 399.74,883.31 ccw(c399.74,880.31) 399.74,877.31 408.33,877.31 cw(c408.33,874.31) 408.33,871.31 399.74,871.31 ccw(c399.74,868.31) 399.74,865.31 408.33,865.31 cw(c408.33,862.31) 408.33,859.31 395.71,859.31 ccw(c395.71,856.31) 395.71,853.31 408.33,853.31 cw(c408.33,850.31) 408.33,847.31 399.74,847.31 ccw(c399.74,844.31) 399.74,841.31 408.33,841.31 cw(c408.33,838.31) 408.33,835.31 399.74,835.31 ccw(c399.74,832.31) 399.74,829.31 408.33,829.31 cw(c408.33,826.31) 408.33,823.31 395.71,823.31 ccw(c395.71,820.31) 395.71,817.31 408.33,817.31 cw(c408.33,814.31) 408.33,811.31 397.33,811.31 ccw(c397.33,808.31) 397.33,805.31 408.33,805.31 cw(c408.33,802.31) 408.33,799.31 399.74,799.31 ccw(c399.74,796.31) 399.74,793.31 407.42,793.31 cw(c407.42,790.31) 407.42,787.31 395.71,787.31 ccw(c395.71,784.31) 395.71,781.31 396.33,781.31 cw(c396.33,778.31) 399.33,778.31 399.33,771.79 399.33,760 cw(c388.83,760) 399.17,758.17 cw(c388.83,760) 390.66,749.66 cw(c388.83,760) 388.83,749.5 383.48,749.5 373.86,749.5 cw(c373.86,752.5) 370.86,752.5 370.86,756.99 ccw(c367.86,756.99) 364.86,756.99 364.86,749.45 cw(c361.86,749.45) 358.86,749.45 358.86,758.5 ccw(c355.86,758.5) 352.86,758.5 352.86,740.5 cw(c349.86,740.5) 346.86,740.5 346.86,758.5 ccw(c343.86,758.5) 340.86,758.5 340.86,752.5 cw(c337.86,752.5) 337.86,749.5 336.36,749.5 ccw(c336.36,735.67) 322.52,735.67 322.52,722.71 ccw(c332.47,722.71) 332.47,712.77 332.55,712.77 335.39,712.77 338.23,712.77 cw(c338.23,709.77) 341.23,709.77 341.23,704.92 ccw(c344.23,704.92) 347.23,704.92 347.23,721.77 cw(c350.23,721.77) 353.23,721.77 353.23,703.77 ccw(c356.23,703.77) 359.23,703.77 359.23,721.77 cw(c362.23,721.77) 365.23,721.77 365.23,703.77 ccw(c368.23,703.77) 371.23,703.77 371.23,721.77 cw(c374.23,721.77) 377.23,721.77 377.23,703.77 ccw(c380.23,703.77) 383.23,703.77 383.23,721.77 cw(c386.23,721.77) 389.23,721.77 389.23,703.77 ccw(c392.23,703.77) 395.23,703.77 395.23,721.77 cw(c398.23,721.77) 401.23,721.77 401.23,715.77 ccw(c404.23,715.77) 404.23,712.77 411.73,712.77 412.23,712.77 417.27,707.73 441.77,707.73 cw(c441.77,691.98) 457.52,691.98 U1.A6@457.52,677.48
FLASH_A17: U1.B7 U3.D8 | length 1074.7
  Top Layer w3: U3.D8@383.74,955 383.74,964.31 cw(c394.43,964.31) 386.86,971.86 ; 386.88,971.88 cw(c394.43,964.31) 394.43,975 416.46,975 cw(c416.46,966.46) 422.49,972.51 cw(c416.46,966.46) 425,966.46 425,954.64 425,953.14 ccw(c428,953.14) 428,950.14 434,950.14 cw(c434,947.14) 434,944.14 416,944.14 ccw(c416,941.14) 416,938.14 434,938.14 cw(c434,935.14) 434,932.14 416,932.14 ccw(c416,929.14) 416,926.14 434,926.14 cw(c434,923.14) 434,920.14 419.57,920.14 ccw(c419.57,917.14) 419.57,914.14 434,914.14 cw(c434,911.14) 434,908.14 420.26,908.14 ccw(c420.26,905.14) 420.26,902.14 434,902.14 cw(c434,899.14) 434,896.14 420.26,896.14 ccw(c420.26,893.14) 420.26,890.14 434,890.14 cw(c434,887.14) 434,884.14 420.26,884.14 ccw(c420.26,881.14) 420.26,878.14 434,878.14 cw(c434,875.14) 434,872.14 420.26,872.14 ccw(c420.26,869.14) 420.26,866.14 434,866.14 cw(c434,863.14) 434,860.14 420.26,860.14 ccw(c420.26,857.14) 420.26,854.14 434,854.14 cw(c434,851.14) 434,848.14 420.26,848.14 ccw(c420.26,845.14) 420.26,842.14 434,842.14 cw(c434,839.14) 434,836.14 420.26,836.14 ccw(c420.26,833.14) 420.26,830.14 434,830.14 cw(c434,827.14) 434,824.14 420.26,824.14 ccw(c420.26,821.14) 420.26,818.14 434,818.14 cw(c434,815.14) 434,812.14 420.26,812.14 ccw(c420.26,809.14) 420.26,806.14 434,806.14 cw(c434,803.14) 434,800.14 420.26,800.14 ccw(c420.26,797.14) 420.26,794.14 432.5,794.14 cw(c432.5,791.14) 432.5,788.14 419.35,788.14 ccw(c419.35,785.14) 419.35,782.14 434,782.14 cw(c434,779.14) 434,776.14 416,776.14 ccw(c416,773.14) 416,770.14 434,770.14 cw(c434,767.14) 434,764.14 416,764.14 ccw(c416,761.14) 416,758.14 434,758.14 cw(c434,755.14) 434,752.14 416,752.14 ccw(c416,749.14) 416,746.14 432.77,746.14 cw(c432.77,743.14) 432.77,740.14 422,740.14 ccw(c422,737.14) 422,734.14 cw(c422,731.14) 425,731.14 425,725.6 425,725.04 425,720 v2(422.93,717.93)
  Top Layer w10: v7(473.27,661.73) U1.B7@489.02,645.98
  Int3 (Sign) w3: v2(422.93,717.93) 425,720 433.56,720 cw(c433.56,694.79) 451.38,712.62 cw(c433.56,694.79) 458.77,694.79 458.77,685.51 ccw(c481.17,685.51) 465.33,669.67 v7(473.27,661.73)
FLASH_A18: U1.A7 U3.A7 | length 1108.2
  Top Layer w3: U3.A7@344.37,1073.11 344.37,1074.51 cw(c363.59,1074.51) 347.05,1084.3 cw(c363.59,1074.51) 350,1088.11 350,1088.81 v4(350.28,1090.08) ; v4(445,795) 445,773.54 ccw(c453.54,773.54) 447.49,767.51 cw(c441.46,761.46) 450,761.46 450,754.94 ccw(c473.99,754.94) 457.03,737.97 cw(c449.83,730.78) 460.01,730.78 ccw(c470.19,730.78) 462.99,723.58 466.64,719.93 cw(c450.63,703.92) 473.27,703.92 ccw(c499.08,703.92) 480.83,685.67 U1.A7@489.02,677.48
  Int1 (Sign) w4: v4(350.28,1090.08) 358.62,1090.07 360.62,1090.07 362.62,1090.07 ccw(c362.62,1094.07) 366.62,1094.07 366.62,1097.56 cw(c370.12,1097.56) 373.62,1097.56 373.62,1094.05 ccw(c377.62,1094.05) 377.62,1090.05 393.28,1090.03 395.28,1090.02 405,1090.01 cw(c405,1065.89) 422.04,1082.96 440,1065 cw(c427.93,1052.93) 445,1052.93 445,1035 445,1033 ccw(c449,1033) 449,1029 453.5,1029 cw(c453.5,1025.5) 453.5,1022 436.5,1022 ccw(c436.5,1018.5) 436.5,1015 452.27,1015 cw(c452.27,1011.5) 452.27,1008 436.5,1008 ccw(c436.5,1004.5) 436.5,1001 452.27,1001 cw(c452.27,997.5) 452.27,994 436.5,994 ccw(c436.5,990.5) 436.5,987 453.5,987 cw(c453.5,983.5) 453.5,980 436.5,980 ccw(c436.5,976.5) 436.5,973 453.5,973 cw(c453.5,969.5) 453.5,966 436.5,966 ccw(c436.5,962.5) 436.5,959 453.5,959 cw(c453.5,955.5) 453.5,952 436.5,952 ccw(c436.5,948.5) 436.5,945 453.5,945 cw(c453.5,941.5) 453.5,938 436.5,938 ccw(c436.5,934.5) 436.5,931 453.5,931 cw(c453.5,927.5) 453.5,924 436.5,924 ccw(c436.5,920.5) 436.5,917 453.5,917 cw(c453.5,913.5) 453.5,910 436.5,910 ccw(c436.5,906.5) 436.5,903 453.5,903 cw(c453.5,899.5) 453.5,896 436.5,896 ccw(c436.5,892.5) 436.5,889 453.5,889 cw(c453.5,885.5) 453.5,882 436.5,882 ccw(c436.5,878.5) 436.5,875 453.5,875 cw(c453.5,871.5) 453.5,868 436.5,868 ccw(c436.5,864.5) 436.5,861 453.5,861 cw(c453.5,857.5) 453.5,854 436.5,854 ccw(c436.5,850.5) 436.5,847 453.5,847 cw(c453.5,843.5) 453.5,840 439.91,840 ccw(c439.91,836.5) 439.91,833 441,833 cw(c441,829) 445,829 445,815.07 v4(445,795)
FLASH_A19: U1.C8 U3.B7 | length 1070.8
  Top Layer w10: v2(330,1020) 343.74,1033.74 U3.B7@344.37,1033.74 ; v7(504.76,629) 505.38,629 519.89,614.49 U1.C8@520.51,614.49
  Int3 (Sign) w3: 356.18,622.8 ccw(c375,641.62) 375,615 470.96,615 ccw(c470.96,662.8) v7(504.76,629)
  Int3 (Sign) w4: 190.86,1005.86 185.77,1000.77 178.07,993.07 cw(c175.24,995.9) 172.41,993.07 169.28,996.2 ccw(c166.8,993.73) 164.33,996.2 ccw(c166.8,993.73) 164.33,991.25 176.3,979.28 cw(c173.82,976.8) 176.3,974.33 cw(c173.82,976.8) 171.35,974.33 159.33,986.35 ccw(c156.85,983.88) 154.38,986.35 ccw(c156.85,983.88) 154.38,981.4 165.89,969.89 cw(c163.42,967.41) 165.89,964.94 cw(c163.42,967.41) 160.94,964.94 149.43,976.45 ccw(c146.95,973.98) 144.48,976.45 ccw(c146.95,973.98) 144.48,971.5 156.5,959.48 cw(c154.03,957.01) 156.5,954.53 cw(c154.03,957.01) 151.55,954.53 139.53,966.55 ccw(c137.06,964.08) 134.58,966.55 ccw(c137.06,964.08) 134.58,961.6 137.76,958.42 cw(c134.93,955.59) 137.76,952.76 136.35,951.35 125.61,940.61 ccw(c151.21,915) 115,915 115,744.14 ccw(c160.73,744.14) 128.39,711.8 200.34,639.85 ccw(c224.12,663.63) 224.12,630 338.79,630 cw(c338.79,605.41) 356.16,622.82 ; 190.88,1005.88 cw(c225,971.72) 225,1020 v2(330,1020)
FLASH_A20: U1.B8 U3.C7 | length 1064.2
  Top Layer w10: v4(327.07,972.93) 327.07,977.07 U3.C7@344.37,994.37 ; v7(504.76,661.73) U1.B8@520.51,645.98
  Int1 (Sign) w4: v4(327.07,972.93) 357.32,972.93 ccw(c357.32,1010.61) 383.96,983.96 ccw(c357.32,1010.61) 395,1010.61 395,1056.93 cw(c402.41,1056.93) 397.17,1062.17 ; 397.18,1062.18 cw(c402.41,1056.93) 402.41,1064.34 cw(c402.41,1051.99) 411.14,1060.73 411.38,1060.5 cw(c402.63,1051.75) 415,1051.75 415,1049.75 ccw(c419,1049.75) 419,1045.75 423.5,1045.75 cw(c423.5,1042.25) 423.5,1038.75 406.5,1038.75 ccw(c406.5,1035.25) 406.5,1031.75 423.5,1031.75 cw(c423.5,1028.25) 423.5,1024.75 406.5,1024.75 ccw(c406.5,1021.25) 406.5,1017.75 422.5,1017.75 cw(c422.5,1014.25) 422.5,1010.75 406.5,1010.75 ccw(c406.5,1007.25) 406.5,1003.75 422.5,1003.75 cw(c422.5,1000.25) 422.5,996.75 406.5,996.75 ccw(c406.5,993.25) 406.5,989.75 422.5,989.75 cw(c422.5,986.25) 422.5,982.75 406.5,982.75 ccw(c406.5,979.25) 406.5,975.75 422.5,975.75 cw(c422.5,972.25) 422.5,968.75 406.5,968.75 ccw(c406.5,965.25) 406.5,961.75 422.5,961.75 cw(c422.5,958.25) 422.5,954.75 406.5,954.75 ccw(c406.5,951.25) 406.5,947.75 409.92,947.75 cw(c409.92,943.75) 413.62,942.23 411.11,936.11 cw(c401.46,945.61) 411.04,936.04 409.11,934.11 407.07,932.07 cw(c390,949.14) 390,925 375.61,925 ccw(c375.61,899.39) 357.5,917.5 ccw(c375.61,899.39) 350,899.39 350,883.54 ccw(c358.54,883.54) 352.49,877.51 ccw(c358.54,883.54) 358.54,875 363.84,875 cw(c363.84,860.12) 374.36,870.64 418,827 cw(c402.08,811.08) 424.6,811.08 424.6,793.05 ccw(c443.05,793.05) 430,780 450,760 464.33,745.67 cw(c449.31,730.65) 464.47,745.53 cw(c449.31,730.65) 464.9,745.07 cw(c449.31,730.65) 465.16,744.8 cw(c449.31,730.65) v2(470.55,730.65)
  Int3 (Sign) w3: v2(470.55,730.65) 471.19,729.46 471.7,728.67 472.34,728.03 472.34,727.66 482.23,717.77 483.29,716.71 ccw(c485.41,718.83) 487.54,716.71 491.78,720.95 cw(c493.9,718.83) 496.02,720.95 cw(c493.9,718.83) 496.02,716.71 483.29,703.98 ccw(c485.41,701.86) 483.29,699.74 ccw(c485.41,701.86) 487.54,699.74 499.6,711.8 cw(c501.72,709.68) 503.84,711.8 cw(c501.72,709.68) 503.84,707.56 500.26,703.98 ccw(c502.39,701.86) 500.26,699.74 502.58,697.42 503.64,696.36 503.89,696.11 cw(c501.76,693.99) 504.05,695.93 511.96,686.68 cw(c504.76,680.48) 511.98,674.31 504.05,665.03 cw(c501.76,666.97) 503.89,664.85 v7@502.77,663.73